# Altium PCB Car_wash_machine.PcbDoc (part 2 of 6)
Units mm, origin at the board's own origin, x right, y up, seen from the top; angles counter-clockwise.
Board outline 229.74 x 149.86 mm, 2 copper layers (Top Layer, Bottom Layer); 256 components, 170 nets, 868 pads, 731 vias.
Unrouted connection lines stored in the file: 362.
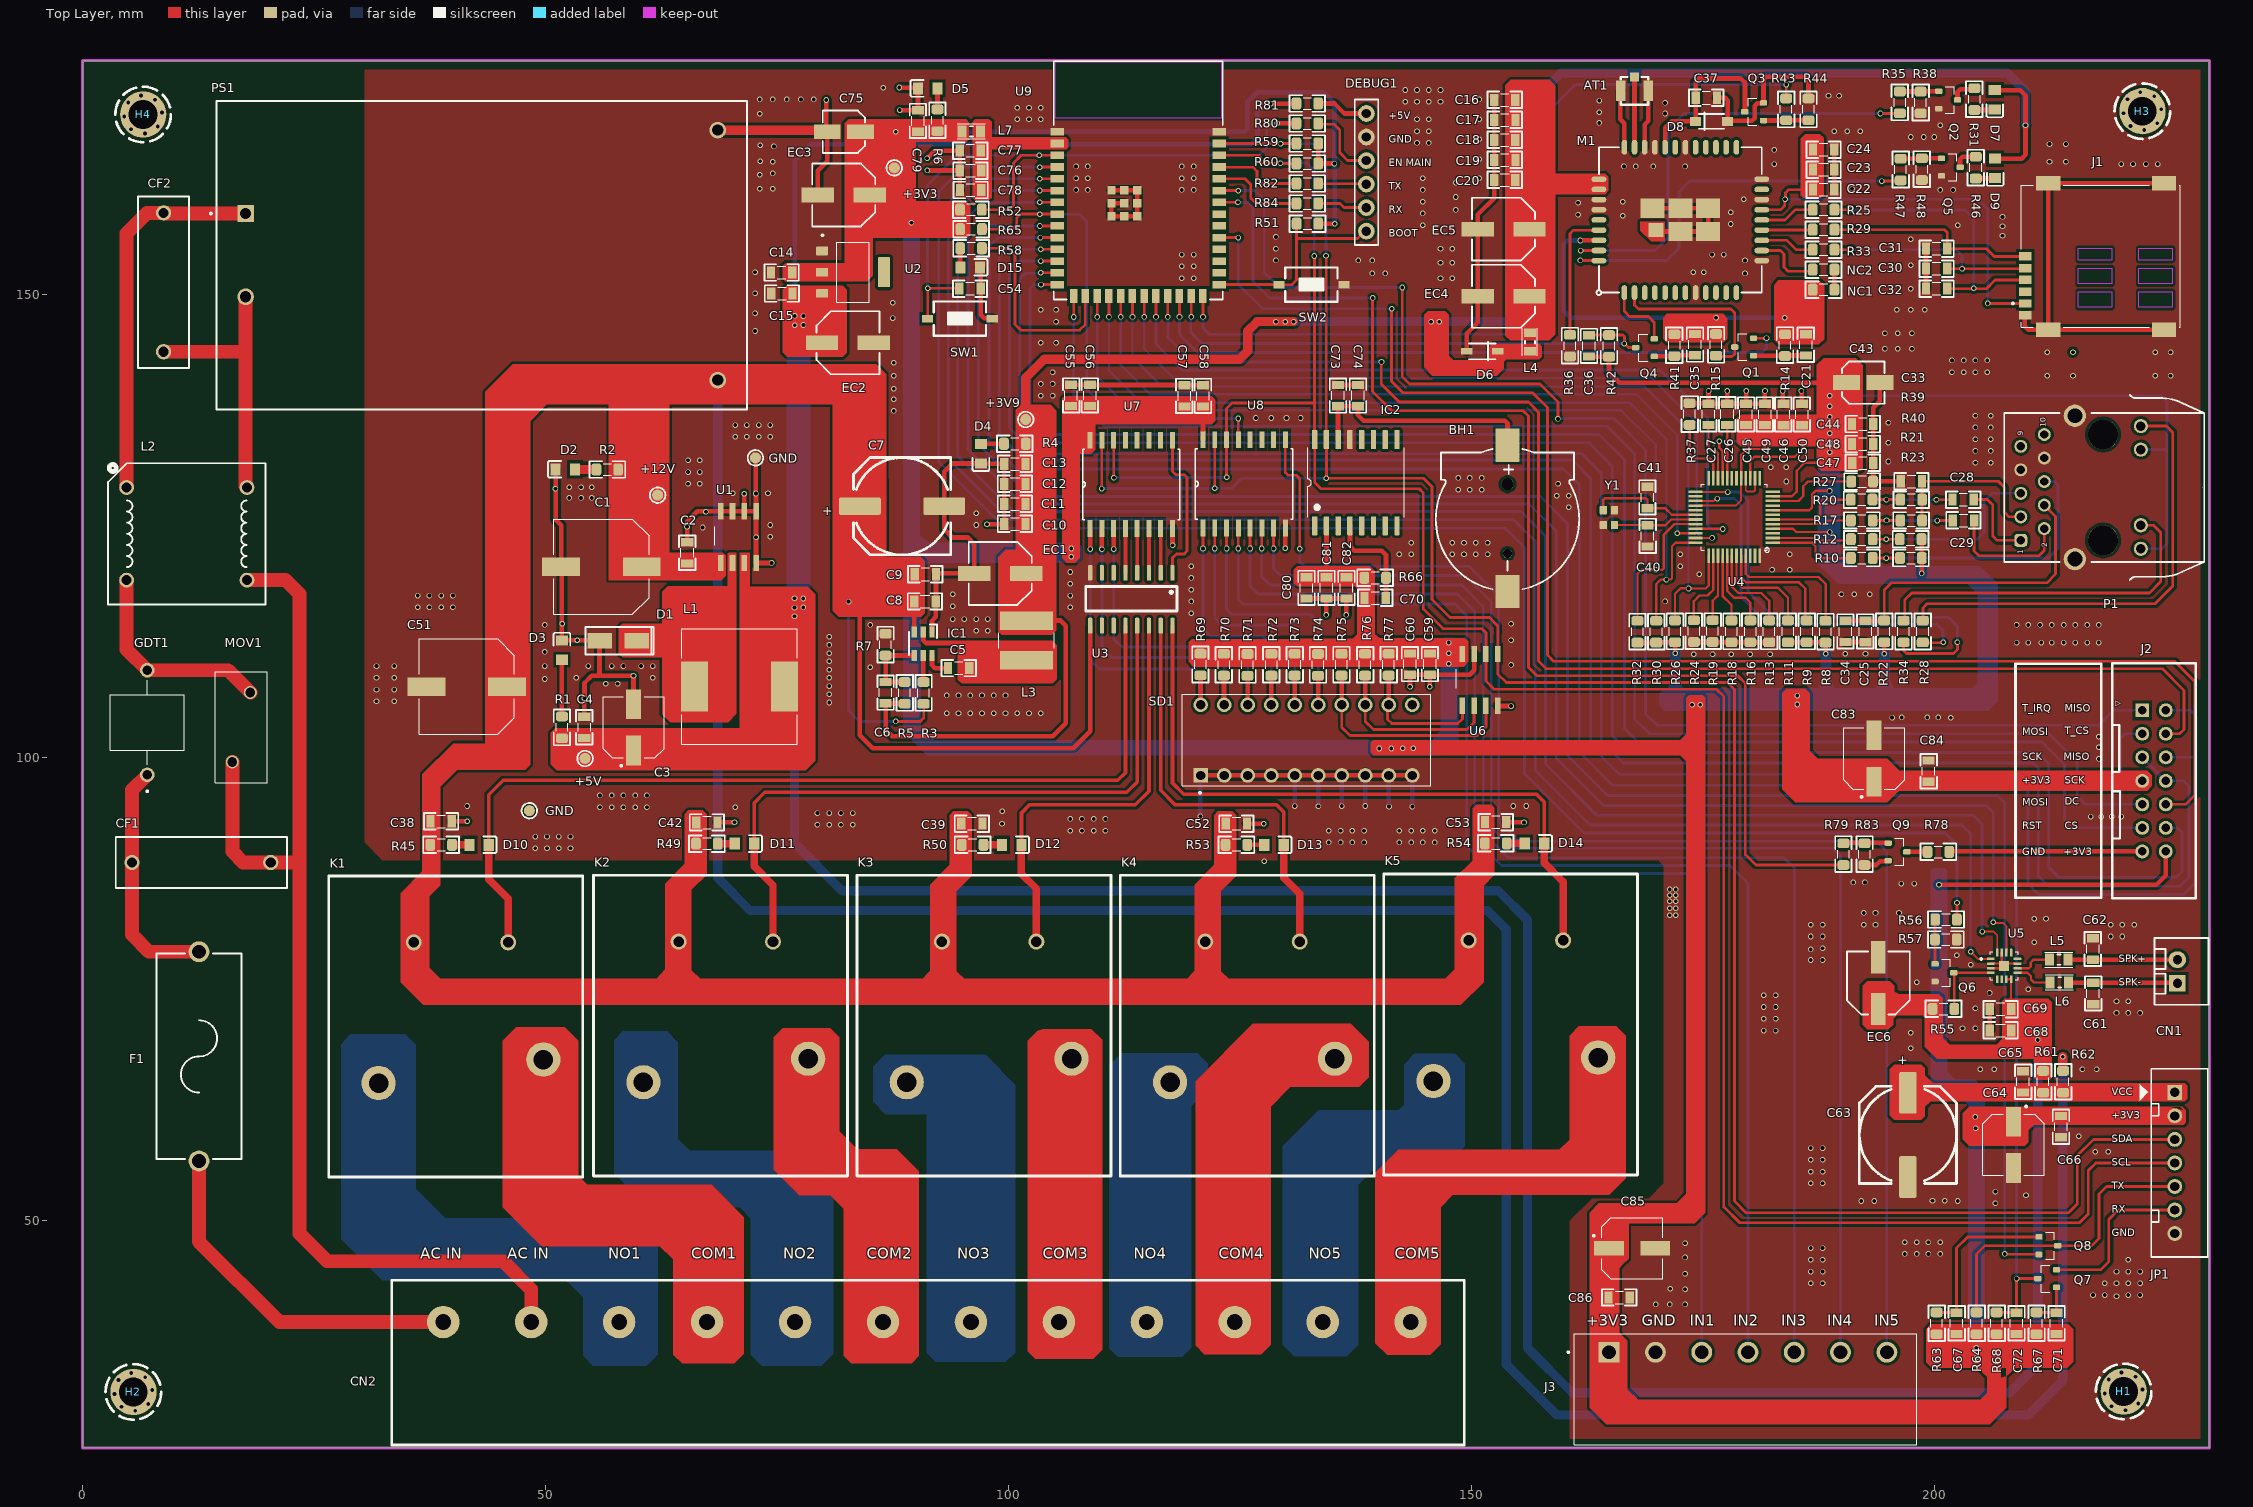
[diagram p0: Top Layer view]

## Part data (continued)
C10 C11: library part "CAP_CER_SMD; 22UF 25V X5R 0805 20%", "25V 22uF X5R ±20% 0805 Multilayer Ceramic Capacitors MLCC - SMD/SMT ROHS", Capacitance=22µF, Case/Package=0805, Dielectric=X5R, Dielectric Material=Ceramic, Manufacturer="Samsung Electro-Mechanics", Manufacturer Part Number=CL21A226MAYNNNE, Max Operating Temperature=85°C, Min Operating Temperature=-55°C, Supplier Part Number 1=1276-CL21A226MAYNNNECT-ND, Tolerance=20%, Voltage Rating=25V, Category="Ceramic Capacitors", China RoHS=Compliant, ComponentLink1Description=https://datasheet.octopart.com:443/CL21A226MAYNNNE-Samsung-Electro-Mechanics-datasheet-137343010.pdf?src-supplier=IHS, ComponentLink1URL=https://datasheet.octopart.com:443/CL21A226MAYNNNE-Samsung-Electro-Mechanics-datasheet-137343010.pdf?src-supplier=IHS, ComponentLink2Description=https://datasheet.octopart.com:443/CL21A226MAYNNNE-Samsung-Electro-Mechanics-datasheet-137126787.pdf?src-supplier=Newark, ComponentLink2URL=https://datasheet.octopart.com:443/CL21A226MAYNNNE-Samsung-Electro-Mechanics-datasheet-137126787.pdf?src-supplier=Newark, ComponentLink3Description=https://datasheet.octopart.com/CL21A226MAYNNNE-Samsung-Electro-Mechanics-datasheet-97040617.pdf, ComponentLink3URL=https://datasheet.octopart.com/CL21A226MAYNNNE-Samsung-Electro-Mechanics-datasheet-97040617.pdf, ComponentLink4Description=https://datasheet.octopart.com/CL21A226MAYNNNE-Samsung-Electro-Mechanics-datasheet-8324245.pdf, ComponentLink4URL=https://datasheet.octopart.com/CL21A226MAYNNNE-Samsung-Electro-Mechanics-datasheet-8324245.pdf, ComponentLink5Description=https://datasheet.octopart.com/General-Multilayer-Ceramic-Capacitors-Samsung-datasheet-family-111.pdf, ComponentLink5URL=https://datasheet.octopart.com/General-Multilayer-Ceramic-Capacitors-Samsung-datasheet-family-111.pdf, ComponentLink6Description=https://datasheet.octopart.com:443/CL21A226MAYNNNE-Samsung-datasheet-8326407.pdf?src-supplier=TME, ComponentLink6URL=https://datasheet.octopart.com:443/CL21A226MAYNNNE-Samsung-datasheet-8326407.pdf?src-supplier=TME, ComponentLink7Description=https://datasheet.octopart.com:443/CL21A226MAYNNNE-Samsung-Electro-Mechanics-datasheet-149154243.pdf?src-supplier=Future+Electronics, ComponentLink7URL=https://datasheet.octopart.com:443/CL21A226MAYNNNE-Samsung-Electro-Mechanics-datasheet-149154243.pdf?src-supplier=Future+Electronics, ComponentLink8Description=http://sigma.octopart.com:80/rohs_certificate/General-Multilayer-Ceramic-Capacitors-Samsung-family-110.pdf?src-supplier=Compliance+Statements, ComponentLink8URL=http://sigma.octopart.com:80/rohs_certificate/General-Multilayer-Ceramic-Capacitors-Samsung-family-110.pdf?src-supplier=Compliance+Statements, ComponentLink9Description=http://sigma.octopart.com:80/rohs_statement/General-Multilayer-Ceramic-Capacitors-Samsung-family-132.pdf?src-supplier=Compliance+Statements, ComponentLink9URL=http://sigma.octopart.com:80/rohs_statement/General-Multilayer-Ceramic-Capacitors-Samsung-family-132.pdf?src-supplier=Compliance+Statements, ComponentLink10Description=http://sigma.octopart.com:80/reach_statement/General-Multilayer-Ceramic-Capacitors-Samsung-family-133.pdf?src-supplier=Compliance+Statements, ComponentLink10URL=http://sigma.octopart.com:80/reach_statement/General-Multilayer-Ceramic-Capacitors-Samsung-family-133.pdf?src-supplier=Compliance+Statements, Height=1.25mm, Length=2mm, Lifecycle Status=Production, Material=Ceramic, Mount="Surface Mount", Number of Terminals=2, Pricing 1="1=0.24, 10=0.14, 50=0.1004, 100=0.0885, 500=0.06838, 1000=0.06218 (USD)", REACH SVHC=Yes, RoHS=Compliant, Schedule B=8532240020, Stock 1=818636, Supplier 1=DigiKey, Voltage Rating (DC)=25V, Width=1.25mm
C16: library part "CAP_CER_SMD; 10PF 50V C0G/NP0 0805 2.5%", "Cap Ceramic 10pF 50V C0G 0.25pF Pad SMD 0805 125°C T/R", Capacitance=10pF, Case Code (Imperial)=0805, Case Code (Metric)=2012, Dielectric=C0G, Dielectric Material=Ceramic, Manufacturer="Samsung Electro-Mechanics", Manufacturer Part Number=CL21C100CBANNNC, Max Operating Temperature=125°C, Min Operating Temperature=-55°C, Supplier Part Number 1=1276-2561-1-ND, Temperature Coefficient=30ppm/°C, Tolerance=5%, Voltage=50V, Case/Package=0805, Category="Ceramic Capacitors", China RoHS=Compliant, ComponentLink1Description=https://datasheet.octopart.com:443/CL21C100CBANNNC-Samsung-Electro-Mechanics-datasheet-136551476.pdf?src-supplier=IHS, ComponentLink1URL=https://datasheet.octopart.com:443/CL21C100CBANNNC-Samsung-Electro-Mechanics-datasheet-136551476.pdf?src-supplier=IHS, ComponentLink2Description=https://datasheet.octopart.com:443/CL21C100CBANNNC-Samsung-Electro-Mechanics-datasheet-149066775.pdf?src-supplier=Future+Electronics, ComponentLink2URL=https://datasheet.octopart.com:443/CL21C100CBANNNC-Samsung-Electro-Mechanics-datasheet-149066775.pdf?src-supplier=Future+Electronics, ComponentLink3Description=https://datasheet.octopart.com:443/CL21C100CBANNNC-Samsung-Electro-Mechanics-datasheet-110334009.pdf?src-supplier=Future+Electronics, ComponentLink3URL=https://datasheet.octopart.com:443/CL21C100CBANNNC-Samsung-Electro-Mechanics-datasheet-110334009.pdf?src-supplier=Future+Electronics, ComponentLink4Description=https://datasheet.octopart.com:443/CL21C100CBANNNC-Samsung-Electro-Mechanics-datasheet-101746655.pdf?src-supplier=Future+Electronics, ComponentLink4URL=https://datasheet.octopart.com:443/CL21C100CBANNNC-Samsung-Electro-Mechanics-datasheet-101746655.pdf?src-supplier=Future+Electronics, ComponentLink5Description=https://datasheet.octopart.com/CL21C100CBANNNC-Samsung-Electro-Mechanics-datasheet-97040617.pdf, ComponentLink5URL=https://datasheet.octopart.com/CL21C100CBANNNC-Samsung-Electro-Mechanics-datasheet-97040617.pdf, ComponentLink6Description=https://datasheet.octopart.com/CL21C100CBANNNC-Samsung-Electro-Mechanics-datasheet-8324245.pdf, ComponentLink6URL=https://datasheet.octopart.com/CL21C100CBANNNC-Samsung-Electro-Mechanics-datasheet-8324245.pdf, ComponentLink7Description=https://datasheet.octopart.com/General-Multilayer-Ceramic-Capacitors-Samsung-datasheet-family-111.pdf, ComponentLink7URL=https://datasheet.octopart.com/General-Multilayer-Ceramic-Capacitors-Samsung-datasheet-family-111.pdf, ComponentLink8Description=https://datasheet.octopart.com:443/CL21C100CBANNNC-Samsung-datasheet-8326407.pdf?src-supplier=TME, ComponentLink8URL=https://datasheet.octopart.com:443/CL21C100CBANNNC-Samsung-datasheet-8326407.pdf?src-supplier=TME, ComponentLink9Description=http://sigma.octopart.com:80/rohs_certificate/General-Multilayer-Ceramic-Capacitors-Samsung-family-110.pdf?src-supplier=Compliance+Statements, ComponentLink9URL=http://sigma.octopart.com:80/rohs_certificate/General-Multilayer-Ceramic-Capacitors-Samsung-family-110.pdf?src-supplier=Compliance+Statements, ComponentLink10Description=http://sigma.octopart.com:80/rohs_statement/General-Multilayer-Ceramic-Capacitors-Samsung-family-132.pdf?src-supplier=Compliance+Statements, ComponentLink10URL=http://sigma.octopart.com:80/rohs_statement/General-Multilayer-Ceramic-Capacitors-Samsung-family-132.pdf?src-supplier=Compliance+Statements, ComponentLink11Description=http://sigma.octopart.com:80/reach_statement/General-Multilayer-Ceramic-Capacitors-Samsung-family-133.pdf?src-supplier=Compliance+Statements, ComponentLink11URL=http://sigma.octopart.com:80/reach_statement/General-Multilayer-Ceramic-Capacitors-Samsung-family-133.pdf?src-supplier=Compliance+Statements, Depth=1.25mm, Height=650µm, Length=2mm, LIBRARY MADE BY="MR. XUAN SIEU", Lifecycle Status=Production, LINK ORIGINAL=https://www.digikey.com/en/products/detail/samsung-electro-mechanics/CL21C100CBANNNC/3888219, LINK VIET NAM=https://linhkien.cxtvn.com/4872-tu-khong-phan-cuc-0805.html, Material=Ceramic, Mount="Surface Mount", Number of Terminals=2, Pricing 1="1=0.1, 10=0.044, 50=0.0302, 100=0.026, 500=0.0169, 1000=0.01376 (USD)", Radiation Hardening=No, REACH SVHC=Yes, RoHS=Compliant, Schedule B="8532240020, 8532240020|8532240020, 8532240020|8532240020|8532240020, 8532240020|8532240020|8532240020|8532240020", Stock 1=78846, Supplier 1=DigiKey, Thickness=762µm, Voltage Rating=50V, Voltage Rating (DC)=50V, Width=1.25mm
C17: library part "CAP_CER_SMD; 33PF 50V C0G/NP0 0805 10%", "Cap Ceramic 33pF (330) 50V C0G 10% SMD 0805 125C Paper T/R", Capacitance=33pF, Case Code (Imperial)=0805, Case Code (Metric)=2012, Dielectric=C0G, Dielectric Material=4241ConductorMaterial, Manufacturer Cross=KEMET, Manufacturer Part Number=C0805C330K5GACTU, Max Operating Temperature=125°C, Min Operating Temperature=-55°C, Package Quantity=4000, Supplier Part Number 1=399-C0805C330K5GACTUCT-ND, Temperature Coefficient=30ppm/°C, Tolerance=10%, Voltage Rating=50V, Case/Package=0805, Category="Ceramic Capacitors", ComponentLink1Description=https://datasheet.ciiva.com/26948/getdatasheetpartid-780465-26948481.pdf?src-supplier=Verical, ComponentLink1URL=https://datasheet.ciiva.com/26948/getdatasheetpartid-780465-26948481.pdf?src-supplier=Verical, ComponentLink2Description="Link Original", ComponentLink2URL=https://www.digikey.com/en/products/detail/kemet/C0805C330K5GACTU/2212525, ComponentLink3Description="Link Cross", ComponentLink3URL=https://www.lcsc.com/product-detail/Multilayer-Ceramic-Capacitors-MLCC-SMD-SMT_KEMET-C0805C330K5GACTU_C2169038.html?s_z=n_C0805C330K5GACTU, ComponentLink4Description="Link Viet Nam", ComponentLink4URL=https://linhkien.cxtvn.com/3499-tu-330-33pf-0805-50v-10c.html, Construction=Flat, Depth=1.25mm, Dissipation Factor=0.1%, Height=0.78mm, Lead Free=5697LeadFree, Lead Pitch=0.75mm, Length=2mm, LIBRARY MADE BY="MR. XUAN SIEU", Material=4241ConductorMaterial, Mount="Surface Mount", Packaging="Tape and Reel", Pricing 1="1=0.1, 10=0.09, 100=0.0688, 1000=0.0514 (USD)", Radiation Hardening=No, Reach SVHC Compliant=No, RoHS=Yes, RoHS Compliant=Yes, Series=C, Stock 1=67884, Supplier 1=Digikey, Termination=SMD/SMT, Thickness=0.035inch, Voltage Rating (DC)=50V, Width=0.049inch
C22: library part "CAPCER0094 0805 0.22uF/25V 220nF", "CAP CER 0.22uF/25V 10% X7R 0805 SMD", CERT=NA, CLASS=B, DESIGN MADE="Huy Cao Keu", LINE=SMT, Mount=SMD, UNIT=PCS
C28 C29: library part "CAP_CER_SMD; 6.8nF 50V C0G/NP0 0805 5%", "Capacitor; Ceramic; Cap; 6.8nF; Tol 5%; SMT; Vol-Rtg 50V; C0G; Tape and Reel", Capacitance=22pF, Case Code (Imperial)=0805, Case Code (Metric)=2012, Dielectric=C0G, Manufacturer Cross=KEMET, Manufacturer Part Number=C0805C220J5GACTU, Max Operating Temperature=125°C, Min Operating Temperature=-55°C, Supplier Part Number 1=399-C0805C220J5GACTUCT-ND, Tolerance=5%, Voltage=50V, Case/Package=0805, Category="Ceramic Capacitors", ComponentLink1Description=https://datasheet.ciiva.com/7842/1732694-7842250.pdf?src-supplier=Element14, ComponentLink1URL=https://datasheet.ciiva.com/7842/1732694-7842250.pdf?src-supplier=Element14, ComponentLink2Description=https://datasheet.ciiva.com/7842/1372242-7842570.pdf?src-supplier=Element14, ComponentLink2URL=https://datasheet.ciiva.com/7842/1372242-7842570.pdf?src-supplier=Element14, ComponentLink3Description=https://datasheet.ciiva.com/7842/1732694-7842251.pdf?src-supplier=Element14, ComponentLink3URL=https://datasheet.ciiva.com/7842/1732694-7842251.pdf?src-supplier=Element14, ComponentLink4Description=https://datasheet.ciiva.com/7842/kem-c1003-c0g-smd-7842569.pdf?src-supplier=Element14, ComponentLink4URL=https://datasheet.ciiva.com/7842/kem-c1003-c0g-smd-7842569.pdf?src-supplier=Element14, ComponentLink5Description=https://datasheet.ciiva.com/28668/1789732-28668761.pdf?src-supplier=Element14, ComponentLink5URL=https://datasheet.ciiva.com/28668/1789732-28668761.pdf?src-supplier=Element14, ComponentLink6Description="Link Cross", ComponentLink6URL=https://www.lcsc.com/product-detail/Multilayer-Ceramic-Capacitors-MLCC-SMD-SMT_KEMET-C0805C220J2GACTU_C1620086.html?s_z=n_C0805C220J5GACTU, ComponentLink7Description="Link Viet Nam", ComponentLink7URL=https://linhkien.cxtvn.com/1061-tu-220-22pf-0805-50v-5-10c.html, ComponentLink8Description="Link Original", ComponentLink8URL=https://www.digikey.com/en/products/detail/kemet/C0805C220J5GACTU/411112, Construction=Flat, Contact Material=Tin, Contact Plating=Tin,Matte, Depth=1.25mm, Height=0.78mm, Lead Free="Lead Free", Length=2mm, LIBRARY MADE BY="MR. XUAN SIEU", Material=Ceramic, Mount="Surface Mount,PCB", Packaging="Tape and Reel", Pricing 1="1=0.1, 10=0.042, 100=0.0243, 1000=0.0194, 4000=0.01203, 8000=0.01082, 12000=0.01022, 20000=0.01004, 28000=0.00958, 40000=0.00932, 100000=0.00858, 200000=0.00772 (USD)", Radiation Hardening=No, Reach SVHC Compliant=No, RoHS=Yes, RoHS Compliant=Yes, Series="SMD Comm C0G", Stock 1=208649, Supplier 1=Digikey, Termination=SMD/SMT, Voltage Rating=50V, Voltage Rating (DC)=50V, Weight=0.000194oz, Width=1.25mm
C30 C31 C32: library part "CAP_CER_SMD; 22PF 50V C0G/NP0 0805 5%_1", "Capacitor; Ceramic; Cap; 22.0pF; Tol 5%; SMT; Vol-Rtg 50V; C0G; Tape and Reel", Capacitance=22pF, Case Code (Imperial)=0805, Case Code (Metric)=2012, Dielectric=C0G, Manufacturer Cross=KEMET, Manufacturer Part Number=C0805C220J5GACTU, Max Operating Temperature=125°C, Min Operating Temperature=-55°C, Supplier Part Number 1=399-C0805C220J5GACTUCT-ND, Tolerance=5%, Voltage=50V, Case/Package=0805, Category="Ceramic Capacitors", ComponentLink1Description=https://datasheet.ciiva.com/7842/1732694-7842250.pdf?src-supplier=Element14, ComponentLink1URL=https://datasheet.ciiva.com/7842/1732694-7842250.pdf?src-supplier=Element14, ComponentLink2Description=https://datasheet.ciiva.com/7842/1372242-7842570.pdf?src-supplier=Element14, ComponentLink2URL=https://datasheet.ciiva.com/7842/1372242-7842570.pdf?src-supplier=Element14, ComponentLink3Description=https://datasheet.ciiva.com/7842/1732694-7842251.pdf?src-supplier=Element14, ComponentLink3URL=https://datasheet.ciiva.com/7842/1732694-7842251.pdf?src-supplier=Element14, ComponentLink4Description=https://datasheet.ciiva.com/7842/kem-c1003-c0g-smd-7842569.pdf?src-supplier=Element14, ComponentLink4URL=https://datasheet.ciiva.com/7842/kem-c1003-c0g-smd-7842569.pdf?src-supplier=Element14, ComponentLink5Description=https://datasheet.ciiva.com/28668/1789732-28668761.pdf?src-supplier=Element14, ComponentLink5URL=https://datasheet.ciiva.com/28668/1789732-28668761.pdf?src-supplier=Element14, ComponentLink6Description="Link Cross", ComponentLink6URL=https://www.lcsc.com/product-detail/Multilayer-Ceramic-Capacitors-MLCC-SMD-SMT_KEMET-C0805C220J2GACTU_C1620086.html?s_z=n_C0805C220J5GACTU, ComponentLink7Description="Link Viet Nam", ComponentLink7URL=https://linhkien.cxtvn.com/1061-tu-220-22pf-0805-50v-5-10c.html, ComponentLink8Description="Link Original", ComponentLink8URL=https://www.digikey.com/en/products/detail/kemet/C0805C220J5GACTU/411112, Construction=Flat, Contact Material=Tin, Contact Plating=Tin,Matte, Depth=1.25mm, Height=0.78mm, Lead Free="Lead Free", Length=2mm, LIBRARY MADE BY="MR. XUAN SIEU", Material=Ceramic, Mount="Surface Mount,PCB", Packaging="Tape and Reel", Pricing 1="1=0.1, 10=0.042, 100=0.0243, 1000=0.0194, 4000=0.01203, 8000=0.01082, 12000=0.01022, 20000=0.01004, 28000=0.00958, 40000=0.00932, 100000=0.00858, 200000=0.00772 (USD)", Radiation Hardening=No, Reach SVHC Compliant=No, RoHS=Yes, RoHS Compliant=Yes, Series="SMD Comm C0G", Stock 1=208649, Supplier 1=Digikey, Termination=SMD/SMT, Voltage Rating=50V, Voltage Rating (DC)=50V, Weight=0.000194oz, Width=1.25mm
C34: library part "CAP_CER_SMD; 22nF 50V C0G/NP0 0805 5%", "Capacitor; Ceramic; Cap; 22.0nF; Tol 5%; SMT; Vol-Rtg 50V; C0G; Tape and Reel", Capacitance=22pF, Case Code (Imperial)=0805, Case Code (Metric)=2012, Dielectric=C0G, Manufacturer Cross=KEMET, Manufacturer Part Number=C0805C220J5GACTU, Max Operating Temperature=125°C, Min Operating Temperature=-55°C, Supplier Part Number 1=399-C0805C220J5GACTUCT-ND, Tolerance=5%, Voltage=50V, Case/Package=0805, Category="Ceramic Capacitors", ComponentLink1Description=https://datasheet.ciiva.com/7842/1732694-7842250.pdf?src-supplier=Element14, ComponentLink1URL=https://datasheet.ciiva.com/7842/1732694-7842250.pdf?src-supplier=Element14, ComponentLink2Description=https://datasheet.ciiva.com/7842/1372242-7842570.pdf?src-supplier=Element14, ComponentLink2URL=https://datasheet.ciiva.com/7842/1372242-7842570.pdf?src-supplier=Element14, ComponentLink3Description=https://datasheet.ciiva.com/7842/1732694-7842251.pdf?src-supplier=Element14, ComponentLink3URL=https://datasheet.ciiva.com/7842/1732694-7842251.pdf?src-supplier=Element14, ComponentLink4Description=https://datasheet.ciiva.com/7842/kem-c1003-c0g-smd-7842569.pdf?src-supplier=Element14, ComponentLink4URL=https://datasheet.ciiva.com/7842/kem-c1003-c0g-smd-7842569.pdf?src-supplier=Element14, ComponentLink5Description=https://datasheet.ciiva.com/28668/1789732-28668761.pdf?src-supplier=Element14, ComponentLink5URL=https://datasheet.ciiva.com/28668/1789732-28668761.pdf?src-supplier=Element14, ComponentLink6Description="Link Cross", ComponentLink6URL=https://www.lcsc.com/product-detail/Multilayer-Ceramic-Capacitors-MLCC-SMD-SMT_KEMET-C0805C220J2GACTU_C1620086.html?s_z=n_C0805C220J5GACTU, ComponentLink7Description="Link Viet Nam", ComponentLink7URL=https://linhkien.cxtvn.com/1061-tu-220-22pf-0805-50v-5-10c.html, ComponentLink8Description="Link Original", ComponentLink8URL=https://www.digikey.com/en/products/detail/kemet/C0805C220J5GACTU/411112, Construction=Flat, Contact Material=Tin, Contact Plating=Tin,Matte, Depth=1.25mm, Height=0.78mm, Lead Free="Lead Free", Length=2mm, LIBRARY MADE BY="MR. XUAN SIEU", Material=Ceramic, Mount="Surface Mount,PCB", Packaging="Tape and Reel", Pricing 1="1=0.1, 10=0.042, 100=0.0243, 1000=0.0194, 4000=0.01203, 8000=0.01082, 12000=0.01022, 20000=0.01004, 28000=0.00958, 40000=0.00932, 100000=0.00858, 200000=0.00772 (USD)", Radiation Hardening=No, Reach SVHC Compliant=No, RoHS=Yes, RoHS Compliant=Yes, Series="SMD Comm C0G", Stock 1=208649, Supplier 1=Digikey, Termination=SMD/SMT, Voltage Rating=50V, Voltage Rating (DC)=50V, Weight=0.000194oz, Width=1.25mm
C36 C72: library part "CAP_CER_SMD; 470PF 50V C0G/NP0 0805 5%", "470 pF ±5% 50V Ceramic Capacitor C0G, NP0 0805 (2012 Metric)", Capacitance=470pF, Case Code (Imperial)=0805, Case Code (Metric)=2012, Insulation Resistance=10GΩ, Manufacturer="Wurth Elektronik", Manufacturer Part Number=885012007061, Max Operating Temperature=125°C, Min Operating Temperature=-55°C, Supplier Part Number 1=732-7856-1-ND, Tolerance=5%, Voltage Rating=50V, Case/Package=0805, Category="Ceramic Capacitors", ComponentLink1Description=https://datasheet.octopart.com:443/885012007061-Wurth-Elektronik-datasheet-159617428.pdf?src-supplier=Wurth+Elektronik, ComponentLink1URL=https://datasheet.octopart.com:443/885012007061-Wurth-Elektronik-datasheet-159617428.pdf?src-supplier=Wurth+Elektronik, ComponentLink2Description=https://datasheet.octopart.com:443/885012007061-W%C3%BCrth-Elektronik-datasheet-82513931.pdf?src-supplier=Wurth+Elektronik, ComponentLink2URL=https://datasheet.octopart.com:443/885012007061-W%C3%BCrth-Elektronik-datasheet-82513931.pdf?src-supplier=Wurth+Elektronik, Height=800µm, Length=2mm, Mount="Surface Mount", Packaging="Cut Tape", Pricing 1="1=0.15, 10=0.086, 50=0.0604, 100=0.0526, 500=0.03956, 1000=0.03554 (USD)", RoHS=Compliant, Stock 1=9826, Supplier 1=DigiKey, Thickness=889µm, Voltage Rating (DC)=50V, Width=1.25mm
C37: library part "CAP_CER_SMD; 100PF 50V C0G/NP0 0805 10%", "100 pF ±5% 50V Ceramic Capacitor C0G, NP0 0805 (2012 Metric)", Manufacturer Cross=Samsung, Manufacturer Part Number=CL21C101JBANNNC, Supplier Part Number 1=1276-1014-1-ND, Voltage Rating (DC)=50V, Category="Ceramic Capacitors", ComponentLink1Description=https://datasheet.ciiva.com/25710/cl21c101jbannnc-25710193.pdf?src-supplier=Digikey, ComponentLink1URL=https://datasheet.ciiva.com/25710/cl21c101jbannnc-25710193.pdf?src-supplier=Digikey, ComponentLink2Description=https://datasheet.ciiva.com/29199/454082-da-01-en-vs-kondensator-0805-29199900.pdf?src-supplier=Conrad, ComponentLink2URL=https://datasheet.ciiva.com/29199/454082-da-01-en-vs-kondensator-0805-29199900.pdf?src-supplier=Conrad, ComponentLink3Description="Link Original", ComponentLink3URL=https://www.digikey.com/en/products/detail/samsung-electro-mechanics/CL21C101JBANNNC/3886672, ComponentLink4Description="Link Cross", ComponentLink4URL=https://www.lcsc.com/product-detail/Multilayer-Ceramic-Capacitors-MLCC-SMD-SMT_Samsung-Electro-Mechanics-CL21C101JBANNNC_C1790.html?s_z=n_CL21C101JBANNNC, ComponentLink5Description="Link Viet Nam", ComponentLink5URL=https://linhkien.cxtvn.com/3499-tu-330-33pf-0805-50v-10c.html, Lead Free=5697LeadFree, LIBRARY MADE BY="MR. XUAN SIEU", Pricing 1="1=0.1, 10=0.037, 100=0.0216, 1000=0.01368 (USD)", RoHS=Yes, RoHS Compliant=5897YesNo, Stock 1=43699, Supplier 1=Digikey
C40 C41: library part "CAP_CER_SMD; 15pF 25V X5R 0805 20%", "25V 15pF X5R ±20% 0805 Multilayer Ceramic Capacitors MLCC - SMD/SMT ROHS", Capacitance=22µF, Case/Package=0805, Dielectric=X5R, Dielectric Material=Ceramic, Manufacturer="Samsung Electro-Mechanics", Manufacturer Part Number=CL21A226MAYNNNE, Max Operating Temperature=85°C, Min Operating Temperature=-55°C, Supplier Part Number 1=1276-CL21A226MAYNNNECT-ND, Tolerance=20%, Voltage Rating=25V, Category="Ceramic Capacitors", China RoHS=Compliant, ComponentLink1Description=https://datasheet.octopart.com:443/CL21A226MAYNNNE-Samsung-Electro-Mechanics-datasheet-137343010.pdf?src-supplier=IHS, ComponentLink1URL=https://datasheet.octopart.com:443/CL21A226MAYNNNE-Samsung-Electro-Mechanics-datasheet-137343010.pdf?src-supplier=IHS, ComponentLink2Description=https://datasheet.octopart.com:443/CL21A226MAYNNNE-Samsung-Electro-Mechanics-datasheet-137126787.pdf?src-supplier=Newark, ComponentLink2URL=https://datasheet.octopart.com:443/CL21A226MAYNNNE-Samsung-Electro-Mechanics-datasheet-137126787.pdf?src-supplier=Newark, ComponentLink3Description=https://datasheet.octopart.com/CL21A226MAYNNNE-Samsung-Electro-Mechanics-datasheet-97040617.pdf, ComponentLink3URL=https://datasheet.octopart.com/CL21A226MAYNNNE-Samsung-Electro-Mechanics-datasheet-97040617.pdf, ComponentLink4Description=https://datasheet.octopart.com/CL21A226MAYNNNE-Samsung-Electro-Mechanics-datasheet-8324245.pdf, ComponentLink4URL=https://datasheet.octopart.com/CL21A226MAYNNNE-Samsung-Electro-Mechanics-datasheet-8324245.pdf, ComponentLink5Description=https://datasheet.octopart.com/General-Multilayer-Ceramic-Capacitors-Samsung-datasheet-family-111.pdf, ComponentLink5URL=https://datasheet.octopart.com/General-Multilayer-Ceramic-Capacitors-Samsung-datasheet-family-111.pdf, ComponentLink6Description=https://datasheet.octopart.com:443/CL21A226MAYNNNE-Samsung-datasheet-8326407.pdf?src-supplier=TME, ComponentLink6URL=https://datasheet.octopart.com:443/CL21A226MAYNNNE-Samsung-datasheet-8326407.pdf?src-supplier=TME, ComponentLink7Description=https://datasheet.octopart.com:443/CL21A226MAYNNNE-Samsung-Electro-Mechanics-datasheet-149154243.pdf?src-supplier=Future+Electronics, ComponentLink7URL=https://datasheet.octopart.com:443/CL21A226MAYNNNE-Samsung-Electro-Mechanics-datasheet-149154243.pdf?src-supplier=Future+Electronics, ComponentLink8Description=http://sigma.octopart.com:80/rohs_certificate/General-Multilayer-Ceramic-Capacitors-Samsung-family-110.pdf?src-supplier=Compliance+Statements, ComponentLink8URL=http://sigma.octopart.com:80/rohs_certificate/General-Multilayer-Ceramic-Capacitors-Samsung-family-110.pdf?src-supplier=Compliance+Statements, ComponentLink9Description=http://sigma.octopart.com:80/rohs_statement/General-Multilayer-Ceramic-Capacitors-Samsung-family-132.pdf?src-supplier=Compliance+Statements, ComponentLink9URL=http://sigma.octopart.com:80/rohs_statement/General-Multilayer-Ceramic-Capacitors-Samsung-family-132.pdf?src-supplier=Compliance+Statements, ComponentLink10Description=http://sigma.octopart.com:80/reach_statement/General-Multilayer-Ceramic-Capacitors-Samsung-family-133.pdf?src-supplier=Compliance+Statements, ComponentLink10URL=http://sigma.octopart.com:80/reach_statement/General-Multilayer-Ceramic-Capacitors-Samsung-family-133.pdf?src-supplier=Compliance+Statements, Height=1.25mm, Length=2mm, Lifecycle Status=Production, Material=Ceramic, Mount="Surface Mount", Number of Terminals=2, Pricing 1="1=0.24, 10=0.14, 50=0.1004, 100=0.0885, 500=0.06838, 1000=0.06218 (USD)", REACH SVHC=Yes, RoHS=Compliant, Schedule B=8532240020, Stock 1=818636, Supplier 1=DigiKey, Voltage Rating (DC)=25V, Width=1.25mm
C43 C75: library part C-ELEC-ALU-SM_1, "Aluminum Electrolytic Capacitors - Surface Mount"
C61 C62: library part "CAP_CER_SMD; 220PF 50V C0G/NP0 0805 10%_1", "220 pF ±5% 50V Ceramic Capacitor C0G, NP0 0805 (2012 Metric)", Manufacturer Cross=Samsung, Manufacturer Part Number=CL21C101JBANNNC, Supplier Part Number 1=1276-1014-1-ND, Voltage Rating (DC)=50V, Category="Ceramic Capacitors", ComponentLink1Description=https://datasheet.ciiva.com/25710/cl21c101jbannnc-25710193.pdf?src-supplier=Digikey, ComponentLink1URL=https://datasheet.ciiva.com/25710/cl21c101jbannnc-25710193.pdf?src-supplier=Digikey, ComponentLink2Description=https://datasheet.ciiva.com/29199/454082-da-01-en-vs-kondensator-0805-29199900.pdf?src-supplier=Conrad, ComponentLink2URL=https://datasheet.ciiva.com/29199/454082-da-01-en-vs-kondensator-0805-29199900.pdf?src-supplier=Conrad, ComponentLink3Description="Link Original", ComponentLink3URL=https://www.digikey.com/en/products/detail/samsung-electro-mechanics/CL21C101JBANNNC/3886672, ComponentLink4Description="Link Cross", ComponentLink4URL=https://www.lcsc.com/product-detail/Multilayer-Ceramic-Capacitors-MLCC-SMD-SMT_Samsung-Electro-Mechanics-CL21C101JBANNNC_C1790.html?s_z=n_CL21C101JBANNNC, ComponentLink5Description="Link Viet Nam", ComponentLink5URL=https://linhkien.cxtvn.com/3499-tu-330-33pf-0805-50v-10c.html, Lead Free=5697LeadFree, LIBRARY MADE BY="MR. XUAN SIEU", Pricing 1="1=0.1, 10=0.037, 100=0.0216, 1000=0.01368 (USD)", RoHS=Yes, RoHS Compliant=5897YesNo, Stock 1=43699, Supplier 1=Digikey
CF1 CF2: library part "CAP_FILM_TH; 0.1uF, 10%, 275V, PITCH15MM", "0.1 µF Film Capacitor 275V Polypropylene (PP), Metallized Radial", Insulation Resistance=30GR, Manufacturer="Wurth Electronics", Manufacturer Part Number=890324025017CS, Supplier Part Number 1=732-5798-ND, Voltage Rating=275V, Category="Film Capacitors", ComponentLink1Description=https://datasheet.ciiva.com/46418/1854504-46418831.pdf?src-supplier=Element14, ComponentLink1URL=https://datasheet.ciiva.com/46418/1854504-46418831.pdf?src-supplier=Element14, Hole Diameter=1.1mm, LIBRARY MADE BY="MR. XUAN SIEU", LINK ORIGINAL=https://www.digikey.com/en/products/detail/w%C3%BCrth-elektronik/890324025017CS/5038923, LINK VIET NAM=https://linhkienchatluong.vn/tu-an-toan---tu-loc-nguon/tu-loc-nguon-ac-01uf-275v-15mm_sp456_ct8057.aspx, Pin Length=4mm, Pitch=15mm, Pricing 1="1=0.39, 50=0.3016, 100=0.2691, 250=0.24752, 500=0.2151, 1000=0.2 (USD)", RoHS=Yes, Stock 1=1376, Supplier 1=Digikey, Voltage Rating (DC)=275V
CN1: library part 2P-2.54
CN2: library part "CONN_TH; TERMINAL_12P_9.5MM", "12 Position Terminal Block 25A", Manufacturer="Phoenix Contact", Manufacturer Part Number=MC1.5/6-G-3.81, Supplier Part Number 1=277-1210-ND, ComponentLink1Description=https://datasheet.octopart.com/MC-1%2C5/-6-G-3%2C81-Phoenix-Contact-datasheet-529459.pdf?src-supplier=Element14, ComponentLink1URL=https://datasheet.octopart.com/MC-1%2C5/-6-G-3%2C81-Phoenix-Contact-datasheet-529459.pdf?src-supplier=Element14, ComponentLink2Description=https://datasheet.octopart.com/1803316-Phoenix-Contact-datasheet-76709.pdf?src-supplier=Digikey, ComponentLink2URL=https://datasheet.octopart.com/1803316-Phoenix-Contact-datasheet-76709.pdf?src-supplier=Digikey, ComponentLink3Description=https://datasheet.octopart.com/1803316-Phoenix-Contact-datasheet-39076.pdf?src-supplier=Today+Components, ComponentLink3URL=https://datasheet.octopart.com/1803316-Phoenix-Contact-datasheet-39076.pdf?src-supplier=Today+Components, LIBRARY MADE BY="MR. XUAN SIEU", LINK ORIGINAL=https://www.digikey.com/en/products/detail/phoenix-contact/1803316/260578, LINK VIET NAM=https://linhkien.cxtvn.com/4817-cau-dau-15edg381-381mm-xanh-cong-mau-nhat.html, Pricing 1="1=2.84, 10=2.015, 25=1.832, 50=1.8256 (USD)", RoHS=Yes, Stock 1=4606, Supplier 1=Digikey
D1: "3.0A Schottky Barrier Rectifiers - Surface Mount"
D2 D3 D4 D5 D10 D11 D12 D13 D14 D15: library part LED_SMD;0805,RED, "WL-SMCW Mono-color Chip LED Waterclear, SMT, size 0805, Red, 2V, 140°", Case/Size Code=0805, Emitting Color=Red, Forward Voltage=2V, Manufacturer="Wurth Elektronik", Manufacturer Part Number=150080RS75000, Operating Temperature Max=85°C, Operating Temperature Min=-40°C, Category="Signal LEDs", Chip Technology=AlInGaP, ComponentLink1Description="Website Link", ComponentLink1URL=https://www.we-online.com/redexpert/article/150080RS75000?ad, ComponentLink2Description="Datasheet Link", ComponentLink2URL=https://www.we-online.com/redexpert/spec/150080RS75000?ad, Dominant Wavelength=625nm, Height=0.7mm, Length=2mm, LIBRARY MADE BY="MR. XUAN SIEU", LINK VIET NAM=https://linhkien.cxtvn.com/6190-led-0805-cac-mau.html, Luminous Intensity=150mcd, Match Code=WL-SMCW, Mount="Surface Mount", Packaging="Tape and Reel", Peak Wavelength=630nm, Viewing Angle=140°, Width=1.25mm
D6: library part DIODE,SMD;DF2S6,TVS,9V, "9V (Typ) Clamp 1A (8/20", Manufacturer Cross=Toshiba, Manufacturer Part Number=DF2S6.8FS,L3M, Min Breakdown Voltage=6.4V, Peak Pulse Current=1A, Power Line Protection=No, Reverse Standoff Voltage=5V, Supplier Part Number 1=DF2S6.8FS(TL4D)CT-ND, Category="TVS Diodes", ComponentLink1Description=http://www.mouser.com/ds/2/408/DF2S6.8FS_datasheet_en_20140709-708755.pdf?src-supplier=Mouser, ComponentLink1URL=http://www.mouser.com/ds/2/408/DF2S6.8FS_datasheet_en_20140709-708755.pdf?src-supplier=Mouser, ComponentLink2Description=https://toshiba.semicon-storage.com/info/docget.jsp?did=22219&prodName=DF2S6.8FS&src-supplier=Digikey, ComponentLink2URL=https://toshiba.semicon-storage.com/info/docget.jsp?did=22219&prodName=DF2S6.8FS&src-supplier=Digikey, ComponentLink3Description="Link Original", ComponentLink3URL=https://www.digikey.com/en/products/detail/toshiba-semiconductor-and-storage/DF2S6-8FS-L3M/3191286?s=N4IgTCBcDaICIDEwGUBsA6AHA5IC6AvkA, ComponentLink4Description="Link Cross", ComponentLink4URL=https://www.lcsc.com/product-detail/ESD-and-Surge-Protection-TVS-ESD_TOSHIBA-DF2S6-8FS-L3M_C1972978.html?s_z=n_DF2S6.8FS%252CL3M, ComponentLink5Description="Link Viet Nam", ComponentLink5URL=N/A, Diode Type=ZENER, LIBRARY MADE BY="MR. XUAN SIEU", Mount="Surface Mount", Number of Unidirectional Channels=1, Packaging="Cut Tape", Pricing 1="1=0.1, 10=0.068, 100=0.025, 500=0.023, 1000=0.021, 2000=0.0205, 5000=0.02 (USD)", RoHS=No, RoHS Compliant=No, Series=-, Stock 1=462569, Supplier 1=Digikey
D7 D9: library part LED_SMD;0805,AMBER, "WL-SMCW Mono-color Chip LED Waterclear, SMT, size 0805, Amber, 2V, 140°", Case/Size Code=0805, Emitting Color=Amber, Forward Voltage=2V, Manufacturer="Wurth Elektronik", Manufacturer Part Number=150080AS75000, Operating Temperature Max=85°C, Operating Temperature Min=-40°C, Category="Signal LEDs", Chip Technology=AlInGaP, ComponentLink1Description="Website Link", ComponentLink1URL=https://www.we-online.com/redexpert/article/150080AS75000?ad, ComponentLink2Description="Datasheet Link", ComponentLink2URL=https://www.we-online.com/redexpert/spec/150080AS75000?ad, Dominant Wavelength=605nm, Height=0.7mm, Length=2mm, LIBRARY MADE BY="MR. XUAN SIEU", LINK VIET NAM=https://linhkien.cxtvn.com/6190-led-0805-cac-mau.html, Luminous Intensity=130mcd, Match Code=WL-SMCW, Mount="Surface Mount", Packaging="Tape and Reel", Peak Wavelength=610nm, Viewing Angle=140°, Width=1.25mm
D8: library part DIODE,SMD;DF2S6,TVS,9V_1, "9V (Typ) Clamp 1A (8/20", Manufacturer Cross=Toshiba, Manufacturer Part Number=DF2S6.8FS,L3M, Min Breakdown Voltage=6.4V, Peak Pulse Current=1A, Power Line Protection=No, Reverse Standoff Voltage=5V, Supplier Part Number 1=DF2S6.8FS(TL4D)CT-ND, Category="TVS Diodes", ComponentLink1Description=http://www.mouser.com/ds/2/408/DF2S6.8FS_datasheet_en_20140709-708755.pdf?src-supplier=Mouser, ComponentLink1URL=http://www.mouser.com/ds/2/408/DF2S6.8FS_datasheet_en_20140709-708755.pdf?src-supplier=Mouser, ComponentLink2Description=https://toshiba.semicon-storage.com/info/docget.jsp?did=22219&prodName=DF2S6.8FS&src-supplier=Digikey, ComponentLink2URL=https://toshiba.semicon-storage.com/info/docget.jsp?did=22219&prodName=DF2S6.8FS&src-supplier=Digikey, ComponentLink3Description="Link Original", ComponentLink3URL=https://www.digikey.com/en/products/detail/toshiba-semiconductor-and-storage/DF2S6-8FS-L3M/3191286?s=N4IgTCBcDaICIDEwGUBsA6AHA5IC6AvkA, ComponentLink4Description="Link Cross", ComponentLink4URL=https://www.lcsc.com/product-detail/ESD-and-Surge-Protection-TVS-ESD_TOSHIBA-DF2S6-8FS-L3M_C1972978.html?s_z=n_DF2S6.8FS%252CL3M, ComponentLink5Description="Link Viet Nam", ComponentLink5URL=N/A, Diode Type=ZENER, LIBRARY MADE BY="MR. XUAN SIEU", Mount="Surface Mount", Number of Unidirectional Channels=1, Packaging="Cut Tape", Pricing 1="1=0.1, 10=0.068, 100=0.025, 500=0.023, 1000=0.021, 2000=0.0205, 5000=0.02 (USD)", RoHS=No, RoHS Compliant=No, Series=-, Stock 1=462569, Supplier 1=Digikey
DEBUG1: library part JP1X6-P2.54-TH, "Pin Header Single Row 2.54MM 6P - Through Hole"
EC1 EC2 EC3 EC4 EC5 EC6: library part "CAP_ALU_SMD; 100UF 20% 16V 6.3x5.5MM", "100 µF 16 V Aluminum Electrolytic Capacitors Radial, Can - SMD 2000 Hrs @ 105°C", ESR (Equivalent Series Resistance)=393.664mR, Insulation Resistance=1MR, Leakage Current=16uA, Manufacturer="Wurth Electronics", Manufacturer Part Number=865060343005, Ripple Current=255mA, Supplier Part Number 1=732-8522-6-ND, Voltage Rating (DC)=16V, Category="Aluminum Electrolytic Capacitors", ComponentLink1Description=http://www.farnell.com/datasheets/1880038.pdf?src-supplier=Farnell, ComponentLink1URL=http://www.farnell.com/datasheets/1880038.pdf?src-supplier=Farnell, ComponentLink2Description=https://katalog.we-online.de/pbs/datasheet/865060343005.pdf?src-supplier=Digikey, ComponentLink2URL=https://katalog.we-online.de/pbs/datasheet/865060343005.pdf?src-supplier=Digikey, ComponentLink3Description=http://www.farnell.com/datasheets/1880038.pdf?src-supplier=Newark, ComponentLink3URL=http://www.farnell.com/datasheets/1880038.pdf?src-supplier=Newark, ComponentLink4Description=http://www.farnell.com/datasheets/1880038.pdf?src-supplier=Element14, ComponentLink4URL=http://www.farnell.com/datasheets/1880038.pdf?src-supplier=Element14, Length=5.5mm, LIBRARY MADE BY="MR. XUAN SIEU", LINK ORIGINAL=https://www.digikey.com/en/products/detail/w%C3%BCrth-elektronik/865060343005/5728117, LINK VIET NAM=https://linhkien.cxtvn.com/2034-tu-nhom-100uf-16v-63x54mm.html, Pricing 1="1=0.3, 50=0.255, 100=0.222, 250=0.197, 500=0.173 (USD)", RoHS=No, Stock 1=6119, Supplier 1=Digikey
F1: library part "FUSE_HOLDER_TH; FUSEHOLDER BLOCKS - PCB - CLIP C; D5L20MM", "1A 250V", Fuse Current=10A, Manufacturer="Wurth Elektronik", Manufacturer Part Number=696101000002, Max Operating Temperature=120°C, Min Operating Temperature=-30°C, Supplier Part Number 1=732-11370-ND, Voltage Rating (AC)=250V, Category="Fuse Holders", ComponentLink1Description=https://datasheet.octopart.com:443/696101000002-W%C3%BCrth-Elektronik-datasheet-117282884.pdf?src-supplier=Upverter, ComponentLink1URL=https://datasheet.octopart.com:443/696101000002-W%C3%BCrth-Elektronik-datasheet-117282884.pdf?src-supplier=Upverter, ComponentLink2Description=https://datasheet.octopart.com:443/696101000002-W%C3%BCrth-Elektronik-datasheet-149525992.pdf?src-supplier=RS+(Formerly+Allied+Electronics), ComponentLink2URL=https://datasheet.octopart.com:443/696101000002-W%C3%BCrth-Elektronik-datasheet-149525992.pdf?src-supplier=RS+(Formerly+Allied+Electronics), ComponentLink3Description=https://datasheet.octopart.com:443/696101000002-W%C3%BCrth-Elektronik-datasheet-38737368.pdf?src-supplier=Farnell, ComponentLink3URL=https://datasheet.octopart.com:443/696101000002-W%C3%BCrth-Elektronik-datasheet-38737368.pdf?src-supplier=Farnell, Height=13.6mm, LIBRARY MADE BY="MR. XUAN SIEU", LINK ORIGINAL=https://www.digikey.com/en/products/detail/w%C3%BCrth-elektronik/696101000002/7244554, LINK VIET NAM=https://linhkien.cxtvn.com/1868-de-cau-chi-5x20mm-co-nap-trong-suot-fs02-hq-6a.html, Mount="Through Hole", Packaging=Box, Pricing 1="1=0.61, 10=0.581, 50=0.5518, 100=0.4923, 250=0.43292, 500=0.3537 (USD)", REACH SVHC=Unknown, RoHS=Compliant, Stock 1=15515, Supplier 1=DigiKey
GDT1: library part GDT;470V,5KA, "Gas Discharge Tube 470 V 5000A (5kA) 2 Pole Through Hole", Case/Package=68Case, Manufacturer Cross="TDK EPCOS", Manufacturer Part Number=B88069X2010S102, Supplier Part Number 1=495-1478-ND, Category=Diodes, ComponentLink1Description=https://datasheet.ciiva.com/323/l71-a470x-323163.pdf?src-supplier=Digikey, ComponentLink1URL=https://datasheet.ciiva.com/323/l71-a470x-323163.pdf?src-supplier=Digikey, ComponentLink2Description=https://datasheet.ciiva.com/15186/getdatasheetpartid-132034-15186806.pdf?src-supplier=Verical, ComponentLink2URL=https://datasheet.ciiva.com/15186/getdatasheetpartid-132034-15186806.pdf?src-supplier=Verical, ComponentLink3Description=https://datasheet.ciiva.com/14186/sxl71a470xx2010s102-14186118.pdf?src-supplier=Distrelec, ComponentLink3URL=https://datasheet.ciiva.com/14186/sxl71a470xx2010s102-14186118.pdf?src-supplier=Distrelec, ComponentLink4Description=https://datasheet.ciiva.com/1225/1486776-1225947.pdf?src-supplier=Newark, ComponentLink4URL=https://datasheet.ciiva.com/1225/1486776-1225947.pdf?src-supplier=Newark, ComponentLink5Description=https://datasheet.ciiva.com/16357/l71-a470x-16357862.pdf?src-supplier=Future+Electronics, ComponentLink5URL=https://datasheet.ciiva.com/16357/l71-a470x-16357862.pdf?src-supplier=Future+Electronics, ComponentLink6Description=https://datasheet.ciiva.com/18403/70102460-18403787.pdf?src-supplier=Allied+Electronics, ComponentLink6URL=https://datasheet.ciiva.com/18403/70102460-18403787.pdf?src-supplier=Allied+Electronics, Contact Plating=154ConductorMaterial, Lead Free=5697LeadFree, LIBRARY MADE BY="MR. XUAN SIEU", Pricing 1="1=3.32, 5=2.758, 10=2.544, 50=2.1108, 100=1.9469, 300=1.71187, 500=1.61186, 1000=1.48475, 5000=1.47125 (USD)", Radiation Hardening=5898YesNo, RoHS=Yes, Stock 1=1155, Supplier 1=Digikey
IC1: library part "IC_SMD; IC REG LDO; SOT23-6; -40to85°C; AP62300TWU-7", "DC-DC Switching Synchronous Buck Regulator, Adjustable, 4.2V-18Vin, 0.8V-7V/3A out, TSOT-26-6", Case/Package=SOT-23-6, Manufacturer=Diodes, Manufacturer Part Number=AP62300TWU-7, Max Input Voltage=18V, Max Operating Temperature=85°C, Max Output Voltage=7V, Min Input Voltage=4.2V, Min Operating Temperature=-40°C, Min Output Voltage=800mV, Output Current=3A, Supplier Part Number 1=31-AP62300TWU-7CT-ND, Switching Frequency=750kHz, Category="Voltage Regulators - Switching", ComponentLink1Description=https://datasheet.octopart.com/AP62300TWU-7-Diodes-Inc.-datasheet-149521341.pdf?src-supplier=Newark, ComponentLink1URL=https://datasheet.octopart.com/AP62300TWU-7-Diodes-Inc.-datasheet-149521341.pdf?src-supplier=Newark, ComponentLink2Description=https://www.diodes.com/assets/Datasheets/AP62300_AP62301_AP62300T.pdf?src-supplier=Digikey, ComponentLink2URL=https://www.diodes.com/assets/Datasheets/AP62300_AP62301_AP62300T.pdf?src-supplier=Digikey, LIBRARY MADE BY="MR. XUAN SIEU", LINK ORIGINAL=https://www.digikey.com/en/products/detail/diodes-incorporated/AP62300TWU-7/12702558, LINK VIET NAM=N/A, Mount="Surface Mount", Number of Outputs=1, Output Configuration=Positive, Output Type=Adjustable, Pricing 1="1=0.3, 10=0.21, 25=0.186, 100=0.16, 250=0.14752, 500=0.14004, 1000=0.13386 (USD)", RoHS=Yes, Series=-, Stock 1=56258, Supplier 1=Digikey, Synchronous Rectifier=Yes
IC2: library part "IC_SMD; IC RTC CLK/CALENDAR_I2C; 16SOIC; DS3231SN", "IC Rtc Clk/calendar I2C 16-SOIC", Case/Package=SOIC, Manufacturer=Maxim, Max Operating Temperature=85°C, Max Supply Voltage=5.5V, Min Operating Temperature=-40°C, Min Supply Voltage=2.3V, Operating Supply Voltage=3.3V, Package Quantity=1000, Supplier Part Number 1=DS3231SN#T&RDKR-ND, Category="Real Time Clocks", Date Format=YY-MM-DD-dd, Interface=I2C,Serial,2-Wire, Lead Free="Lead Free", LIBRARY MADE BY="MR. XUAN SIEU", LINK ORIGINAL=https://www.digikey.com/en/products/detail/analog-devices-inc-maxim-integrated/DS3231SN-T-R/1197577, LINK VIET NAM=https://linhkien.cxtvn.com/3008-ds3231sn-ds3231-sop-16.html, Logic Function=Clock, Manufacturer Part Number=DS3231SN#T&R, Mount="Surface Mount", Number of Pins=16, Packaging="Tape and Reel", Pricing 1="1=12.82, 10=10.089, 25=9.4052, 100=8.6535, 250=8.2952, 500=8.07934 (USD)", Radiation Hardening=No, RoHS=Yes, RoHS Compliant=Yes, Series=-, Stock 1=1977, Supplier 1=Digikey, Time Format=HH:MM:SS
J1: "Micro SIM Card Connector, 6 Positions, Connector and Ejector, Push In, Auto Eject Out, Surface Mount, 1.37 mm Height Above Board, Gold Flash", Package=None, Check_prices=https://www.snapeda.com/parts/MSIM-2-A/Same+Sky/view-part/?ref=eda, MF="Same Sky", MP=MSIM-2-A, SnapEDA_Link=https://www.snapeda.com/parts/MSIM-2-A/Same+Sky/view-part/?ref=snap
J2: library part IDE_14P_2.54MM, "Conn Shrouded Header (4 Sides) HDR 14 POS 2.54mm Solder ST Top Entry Thru-Hole C-GridÂ® Tray", Package=None, Check_prices=https://www.snapeda.com/parts/702461404/Molex/view-part/?ref=eda, MF=Molex, MP=702461404, SnapEDA_Link=https://www.snapeda.com/parts/702461404/Molex/view-part/?ref=snap
J3: "7 Position Terminal Block Header, Male Pins, Shrouded (4 Side) 0.197 (5.00mm) 90°, Right Angle - Through Hole", Package=None, Check_prices=https://www.snapeda.com/parts/796644-7/TE+Connectivity/view-part/?ref=eda, EU_RoHS_Compliance=Compliant, MF="TE Connectivity", MP=796644-7, SnapEDA_Link=https://www.snapeda.com/parts/796644-7/TE+Connectivity/view-part/?ref=snap
JP1: library part Con7, "Connector 7"
K1 K2 K3 K4 K5: "27.4 x 31.8 x 20 mm, 24 V, 30 A, SPST (1 Form A), Power Relay", Package=None, Check_prices=https://www.snapeda.com/parts/PR23-24V-900-1A/Same+Sky/view-part/?ref=eda, MF="Same Sky", MP=PR23-24V-900-1A, SnapEDA_Link=https://www.snapeda.com/parts/PR23-24V-900-1A/Same+Sky/view-part/?ref=snap
L1: library part "IND_SMD; FIXED IND 68UH 3A 28 MOHM 12.3x12.3MM_1", "FIXED IND 68uH 2A 140mΩ SMD,12.3x12.3mm", Case/Package=2424, Current Rating=3.4A, DC Resistance (DCR)=28mΩ, Inductance=3.3µH, Manufacturer=Abracon, Manufacturer Part Number=ASPI-0628-3R3M-T1, Max Operating Temperature=120°C, Min Operating Temperature=-25°C, Saturation Current=3.6A, Supplier Part Number 1=535-12808-6-ND, Test Frequency=100kHz, Tolerance=20%, Category="Fixed Inductors", China RoHS=Compliant, ComponentLink1Description=https://datasheet.octopart.com:443/ASPI-0628-3R3M-T1-Abracon-datasheet-182213420.pdf?src-supplier=Master+Electronics, ComponentLink1URL=https://datasheet.octopart.com:443/ASPI-0628-3R3M-T1-Abracon-datasheet-182213420.pdf?src-supplier=Master+Electronics, ComponentLink2Description=https://datasheet.octopart.com:443/ASPI-0628-3R3M-T1-Abracon-datasheet-141160310.pdf?src-supplier=JRH+Electronics, ComponentLink2URL=https://datasheet.octopart.com:443/ASPI-0628-3R3M-T1-Abracon-datasheet-141160310.pdf?src-supplier=JRH+Electronics, ComponentLink3Description=https://datasheet.octopart.com:443/ASPI-0628-3R3M-T1-Abracon-datasheet-101745434.pdf?src-supplier=Sager+Electronics, ComponentLink3URL=https://datasheet.octopart.com:443/ASPI-0628-3R3M-T1-Abracon-datasheet-101745434.pdf?src-supplier=Sager+Electronics, ComponentLink4Description=https://sigma.octopart.com:443/141160311/technical_drawing/Abracon-ASPI-0628-3R3M-T1.pdf?src-supplier=Abracon+SCT, ComponentLink4URL=https://sigma.octopart.com:443/141160311/technical_drawing/Abracon-ASPI-0628-3R3M-T1.pdf?src-supplier=Abracon+SCT, ComponentLink5Description=http://sigma.octopart.com:80/conflict_mineral_statement/Abracon-company-27.pdf?src-supplier=Compliance+Statements, ComponentLink5URL=http://sigma.octopart.com:80/conflict_mineral_statement/Abracon-company-27.pdf?src-supplier=Compliance+Statements, Composition=Wirewound, Core Material=Ferrite, Height=2.8mm, Height - Seated (Max)=2.794mm, Length=6mm, LIBRARY MADE BY="MR. XUAN SIEU", Lifecycle Status=Production, LINK ORIGINAL=https://www.digikey.com/en/products/detail/abracon-llc/ASPI-0628-3R3M-T1/5043505, LINK VIET NAM=https://linhkien.cxtvn.com/9145-cuon-cam-5d28-cac-gia-tri.html, Max Current Rating=3.4A, Mount="Surface Mount", Number of Circuits=1, Number of Terminals=2, Pricing 1="1=0.33, 10=0.275, 100=0.226 (USD)", REACH SVHC=Yes, Resistance=28mΩ, RoHS=Compliant, Shielding=Yes, Stock 1=889, Supplier 1=DigiKey, Width=6mm
L2: library part "CHOKE_TH; 20uH, 1A, UU10A", "20 µH @ 1 kHz 2 Line Common Mode Choke Through Hole 1A DCR 120mOhm", Manufacturer=KEMET, Supplier Part Number 1=399-SU10VD-10020-ND, Category="Common Mode Chokes", LIBRARY MADE BY="MR. XUAN SIEU", LINK ORIGINAL=https://www.digikey.com/en/products/detail/kemet/SU10VD-10020/10321596, LINK VIET NAM=https://linhkienchatluong.vn/cuon-loc/cuon-loc-10mh-04mm-uu105uf105-10x13mm_sp487_ct3535.aspx, Manufacturer Part Number=SU10VD-10020, Pricing 1="1=1.61, 10=1.324, 25=1.2248, 40=1.177, 100=1.0889, 300=0.992, 500=0.94998, 1000=0.89584, 2400=0.83195 (USD)", RoHS=No, Stock 1=55, Supplier 1=Digikey
L3: library part "IND_SMD; FIXED IND 3.3UH 3.4A 28 MOHM 6x6x2.8MM", "Inductor Power Shielded/Molded Wirewound 3.3uH 20% 100KHz Ferrite 3.4A 0.028Ohm DCR 2424 T/R", Case/Package=2424, Current Rating=3.4A, DC Resistance (DCR)=28mΩ, Inductance=3.3µH, Manufacturer=Abracon, Manufacturer Part Number=ASPI-0628-3R3M-T1, Max Operating Temperature=120°C, Min Operating Temperature=-25°C, Saturation Current=3.6A, Supplier Part Number 1=535-12808-6-ND, Test Frequency=100kHz, Tolerance=20%, Category="Fixed Inductors", China RoHS=Compliant, ComponentLink1Description=https://datasheet.octopart.com:443/ASPI-0628-3R3M-T1-Abracon-datasheet-182213420.pdf?src-supplier=Master+Electronics, ComponentLink1URL=https://datasheet.octopart.com:443/ASPI-0628-3R3M-T1-Abracon-datasheet-182213420.pdf?src-supplier=Master+Electronics, ComponentLink2Description=https://datasheet.octopart.com:443/ASPI-0628-3R3M-T1-Abracon-datasheet-141160310.pdf?src-supplier=JRH+Electronics, ComponentLink2URL=https://datasheet.octopart.com:443/ASPI-0628-3R3M-T1-Abracon-datasheet-141160310.pdf?src-supplier=JRH+Electronics, ComponentLink3Description=https://datasheet.octopart.com:443/ASPI-0628-3R3M-T1-Abracon-datasheet-101745434.pdf?src-supplier=Sager+Electronics, ComponentLink3URL=https://datasheet.octopart.com:443/ASPI-0628-3R3M-T1-Abracon-datasheet-101745434.pdf?src-supplier=Sager+Electronics, ComponentLink4Description=https://sigma.octopart.com:443/141160311/technical_drawing/Abracon-ASPI-0628-3R3M-T1.pdf?src-supplier=Abracon+SCT, ComponentLink4URL=https://sigma.octopart.com:443/141160311/technical_drawing/Abracon-ASPI-0628-3R3M-T1.pdf?src-supplier=Abracon+SCT, ComponentLink5Description=http://sigma.octopart.com:80/conflict_mineral_statement/Abracon-company-27.pdf?src-supplier=Compliance+Statements, ComponentLink5URL=http://sigma.octopart.com:80/conflict_mineral_statement/Abracon-company-27.pdf?src-supplier=Compliance+Statements, Composition=Wirewound, Core Material=Ferrite, Height=2.8mm, Height - Seated (Max)=2.794mm, Length=6mm, LIBRARY MADE BY="MR. XUAN SIEU", Lifecycle Status=Production, LINK ORIGINAL=https://www.digikey.com/en/products/detail/abracon-llc/ASPI-0628-3R3M-T1/5043505, LINK VIET NAM=https://linhkien.cxtvn.com/9145-cuon-cam-5d28-cac-gia-tri.html, Max Current Rating=3.4A, Mount="Surface Mount", Number of Circuits=1, Number of Terminals=2, Pricing 1="1=0.33, 10=0.275, 100=0.226 (USD)", REACH SVHC=Yes, Resistance=28mΩ, RoHS=Compliant, Shielding=Yes, Stock 1=889, Supplier 1=DigiKey, Width=6mm
L4 L5 L6 L7: library part "Ferrite Bead", "FERRITE BEAD", Code_IEC=1005, Code_JEITA=0402, LatestRevisionDate=29-May-2009, LatestRevisionNote="IPC-7351 Footprint Added.", PackageDescription="Chip Inductor", Published=8-Jun-2000, Publisher="Altium Limited"
M1: library part "MODULE_SMD; MODULE SIM 4G, A7680C_CHIP", "Cellular module; LTE Cat1 bis; GNSS (option)", Package=None, Availability="Not in stock", Check_prices=https://www.snapeda.com/parts/SIM868/MikroElektronika/view-part/?ref=eda, LIBRARY MADE BY="MR. XUAN SIEU", LINK ORIGINAL=https://cn.simcom.com/product/A7680C.html, LINK VIET NAM=https://www.lazada.vn/products/bo-dieu-khien-simcom-a7680c-cat1-kich-thuoc-nho-tuong-thich-voi-sim800c-toan-cau-4g-lte-ho-tro-giao-thuc-tcpip-co-the-goi-dien-thoai-i2831789045.html?srsltid=AfmBOoosQrxJde6jj3jMc_vCVE_fzO6UQJ8IH7P6YqoQoCxdnF-xPq5n, MF=MikroElektronika, MP=SIM868, Price=None, SnapEDA_Link=https://www.snapeda.com/parts/SIM868/MikroElektronika/view-part/?ref=snap